# Altium PCB VCB2020.PcbDoc (part 3 of 3)
Units mm, origin at the board's own origin, x right, y up, seen from the top; angles counter-clockwise.
Board outline 146 x 96 mm, 2 copper layers (Top Layer, Bottom Layer); 155 components, 105 nets, 540 pads, 1006 vias.
Unrouted connection lines stored in the file: 5.
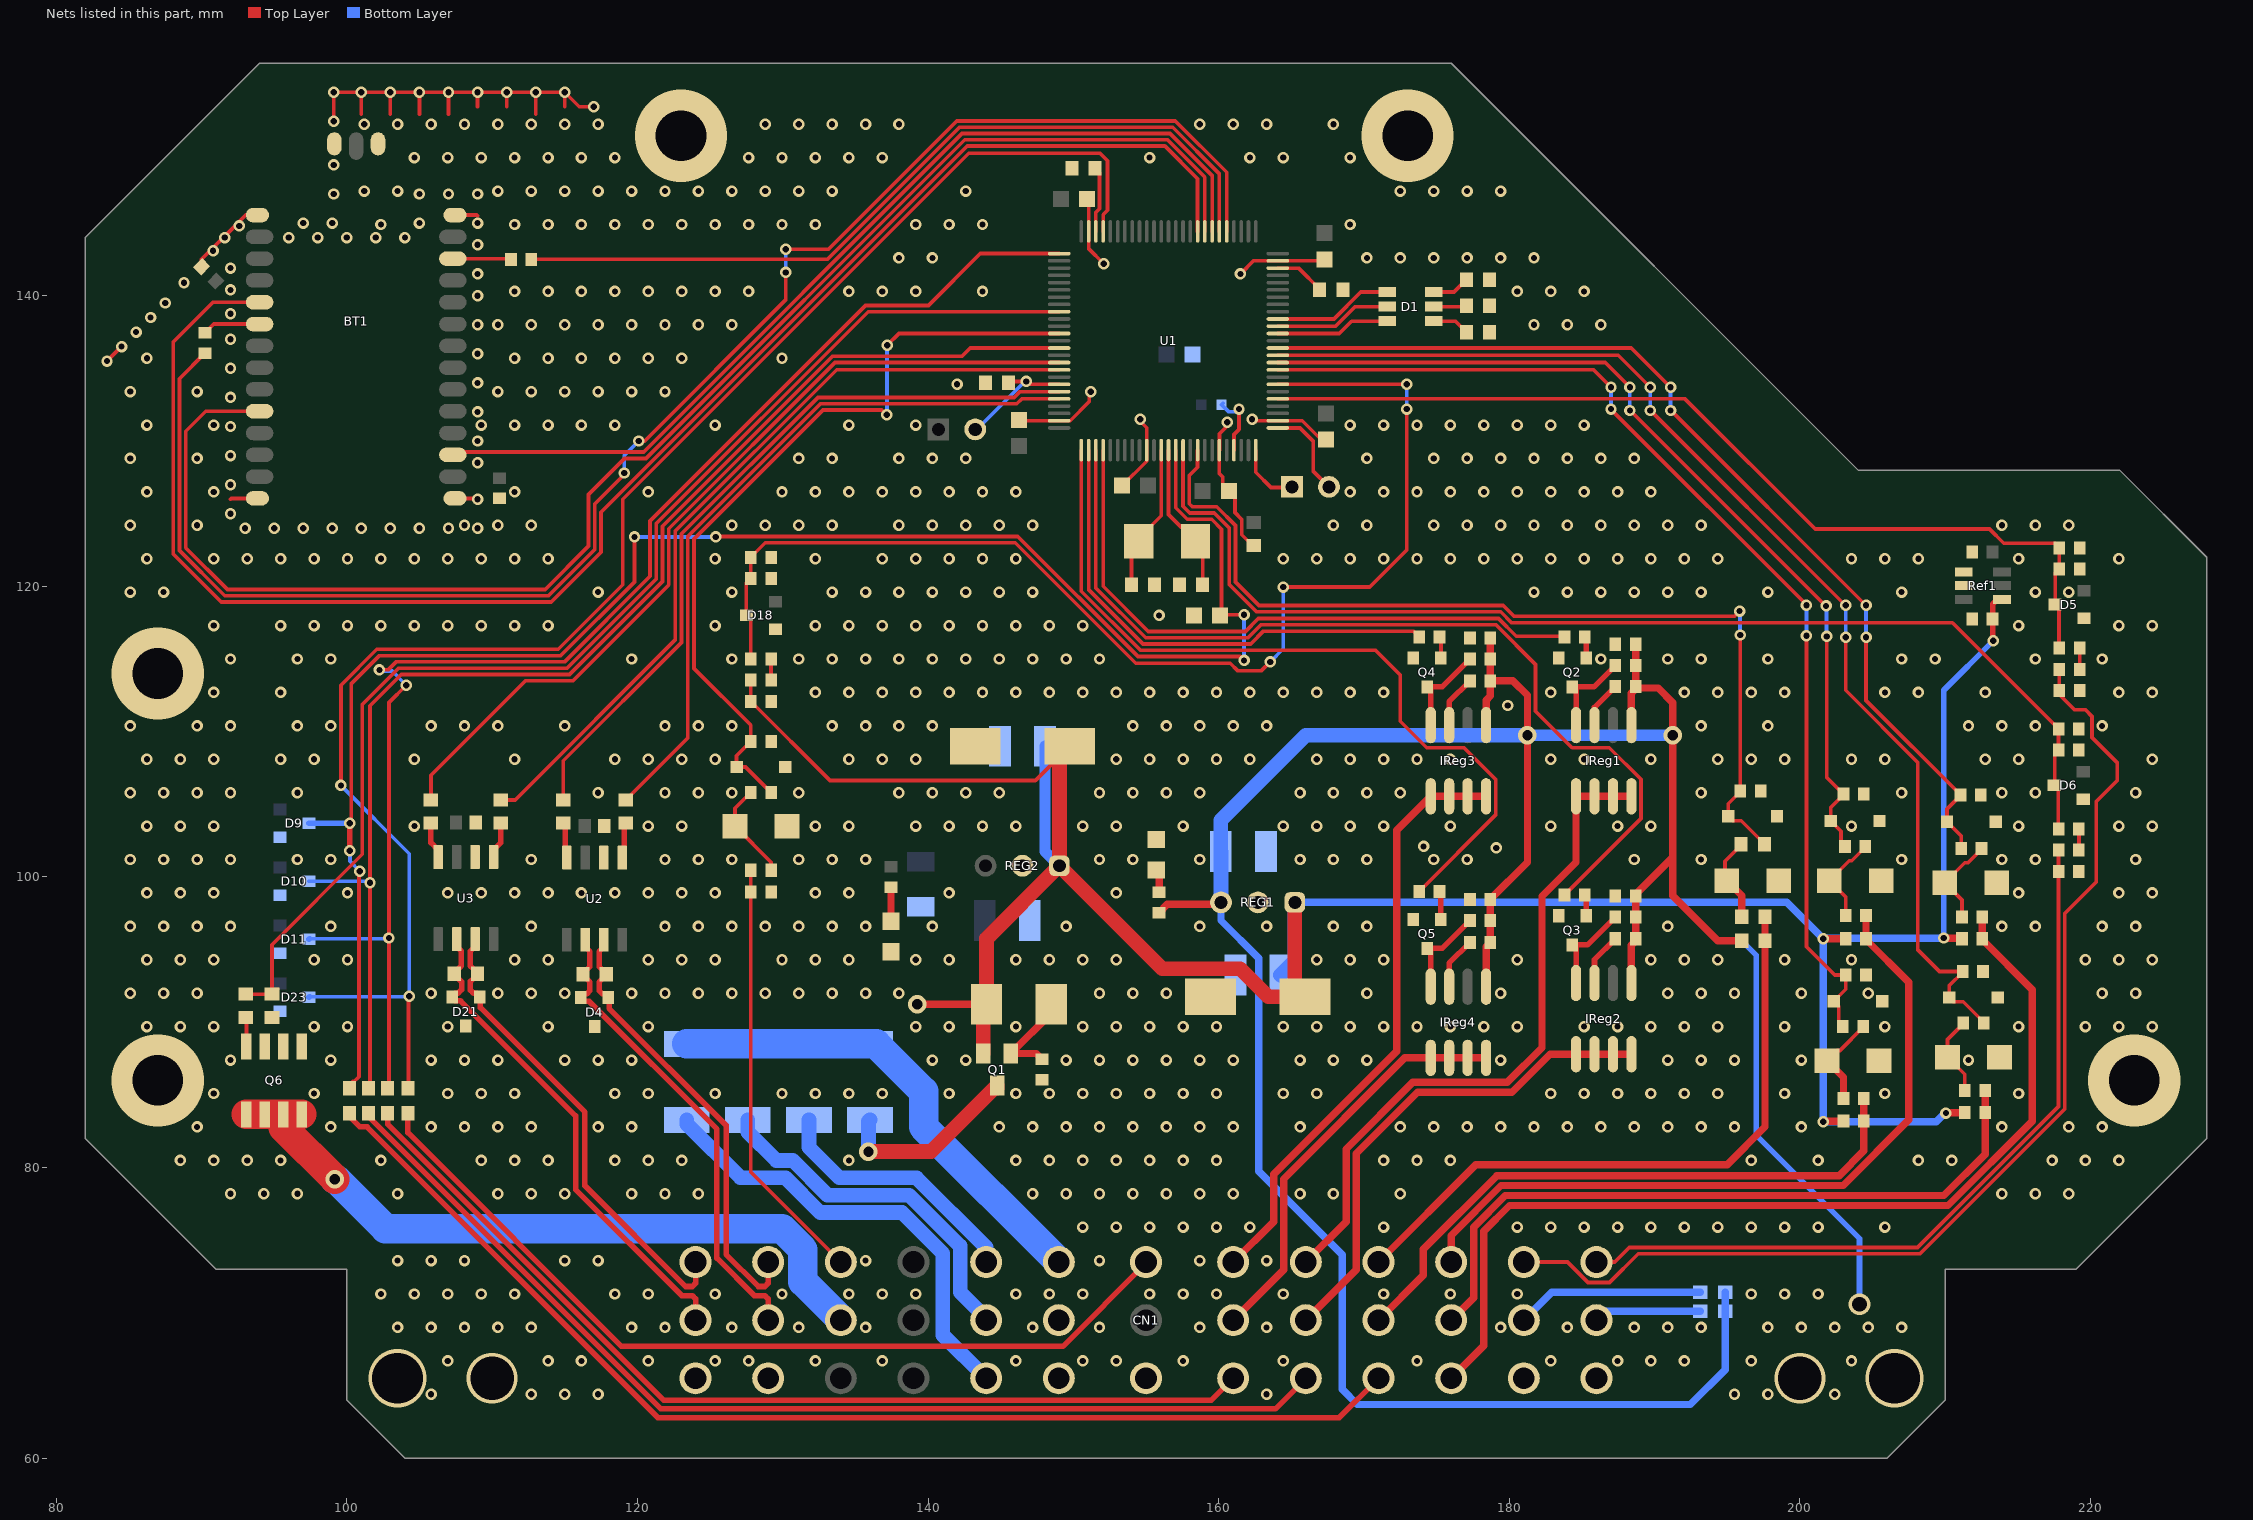
[diagram p2: the nets of this part, all layers, seen from the top]

## Via types
v1: diameter 0.787, hole 0.423, Top Layer to Bottom Layer, 859 vias
v2: diameter 0.787, hole 0.432, Top Layer to Bottom Layer, 126 vias
v3: diameter 1.27, hole 0.711, Top Layer to Bottom Layer, 10 vias
v4: diameter 6.35, hole 3.48, Top Layer to Bottom Layer, 5 vias
v5: diameter 1.5, hole 1, Top Layer to Bottom Layer, 2 vias
v6: diameter 3.5, hole 3, Top Layer to Bottom Layer, 2 vias
v7: diameter 4, hole 3.5, Top Layer to Bottom Layer, 2 vias

## Nets (pads, with @x,y where several pads share a name; then routed paths per layer and width w, separated by ;. In a path a pad name is that pad's centre, name@x,y a point inside that pad or via, vN(x,y) a via of type N, cw(c..) or ccw(c..) an arc to the next point about the centre after c; other vN are vias at no path point) (continued)
5v: C14.2 C34.2 C35.2 C36.2 C37.2 F1.1 F2.1 IReg1.1 IReg2.1 IReg3.1 IReg4.1 R6.1 R20.2 R47.1 R48.1 R50.1 R51.1 R53.1 R54.1 R56.1 R57.1 REG1.3 | length 209.6
  Top Layer w0.508: R6.1@155.904,97.55 156.472,98.118 160.16,98.118 REG1.3@160.16,98.25 ; IReg4.1@178.405,92.45 178.405,95.205 R56.1@178.7,95.5 R57.1@178.7,97 C37.2@178.7,98.454 181.25,101.004 v3(181.25,109.75) 181.25,112.5 180.25,113.5 R53.1@178.7,113.5 ; IReg3.1@178.405,110.45 178.405,112.155 178.7,112.45 R53.1@178.7,113.5 ; C36.2@178.7,116.454 R54.1@178.7,115 R53.1@178.7,113.5 ; IReg2.1@188.405,92.95 188.405,95.309 188.7,95.604 188.7,97.059 R51.1@188.7,97.25 188.7,98.8 191.25,101.35 ; IReg1.1@188.405,110.45 188.405,112.655 188.75,113 190.25,113 191.25,112 v3(191.25,109.75) 191.25,101.35 ; R47.1@188.7,113.5 C34.2@188.7,116.013 ; R20.2@196,95.6 194.35,95.6 191.25,98.7 191.25,101.35
  Bottom Layer w0.381: 196,95.6 197,94.6 197,82.208 204.1,75.108 v5(204.1,70.6)
  Bottom Layer w0.508: REG1.3@160.16,98.25 160.16,97.001 162.75,94.411 162.75,79.75 168.5,74 168.5,64.75 169.55,63.7 192.45,63.7 194.85,66.1 F1.1@194.85,70.113 F2.1@194.85,71.42
  Bottom Layer w0.762: v3(181.25,109.75) v3(191.25,109.75)
  Bottom Layer w1.016: REG1.3@160.16,98.25 160.16,101.74 C14.2@160.15,101.75 160.15,103.9 166,109.75 v3(181.25,109.75)
"\B\r\a\k\e\ \P\r\e\s\s": CN1.10 R20.1 R21.1 | length 44.9
  Top Layer w0.508: CN1.10@171,73.5 177.7,80.2 195,80.2 197.6,82.8 R20.1@197.6,95.6 R21.1@197.6,97.25
"APPS 1 5V": CN1.1 R16.1 R18.2 | length 53.9
  Top Layer w0.254: CN1.1@186,73.5 187.25,73.5 188.25,74.5 208.09,74.5 217.8,84.21 R18.2@217.8,100.387 R16.1@217.8,101.841
"APPS 1 Pwr": CN1.2 F1.2 | length 7.4
  Bottom Layer w0.508: CN1.2@186,69.5 186.613,70.113 F1.2@193.15,70.113
"APPS 2 5V": CN1.4 R12.1 R14.2 | length 76.9
  Top Layer w0.254: CN1.4@181,73.25 CN1.4@181,73.5 184.013,73.5 185.418,72.095 186.895,72.095 188.868,74.068 208.269,74.068 218.232,84.031 218.232,97.482 220.4,99.65 220.4,105.2 221.848,106.648 221.848,107.85 220.1,109.599 220.1,111.05 219.65,111.5 218.9,111.5 217.85,112.55 R14.2@217.85,112.837 R12.1@217.85,114.291
"APPS 2 Pwr": CN1.5 F2.2 | length 12.9
  Bottom Layer w0.508: CN1.5@181,69.5 182.92,71.42 F2.2@193.15,71.42
"BCO Ctrl": CN1.32 Q6.5 Q6.6 Q6.7 Q6.8 | length 49.9
  Top Layer w2.032: Q6.5@93.095,83.66 Q6.6@94.365,83.66 Q6.7@95.635,83.66 ; Q6.7@95.635,83.67 Q6.7@95.635,83.66 ; Q6.8@96.905,83.66 Q6.7@95.635,83.66 ; v3(99.175,79.2) 95.635,82.74 Q6.7@95.635,83.66
  Bottom Layer w2.032: v3(99.175,79.2) 99.25,79.2 102.656,75.794 129.95,75.794 131.387,74.357 131.387,72.158 134,69.545 CN1.32@134,69.5
BOOT0: P1.2 R4.1 U1.94 | length 8.9
  Top Layer w0.254: P1.2@143.25,130.8 P1.2@143.601,131.151 ; R4.1@145.55,134 145.65,134.1 v2(146.75,134.1) ; v2@146.75,133.9 U1.94@149.025,133.9
  Bottom Layer w0.254: P1.2@143.25,130.8 143.35,130.8 146.65,134.1 v2(146.75,134.1)
"BPS Interm": D7.2 R21.2 R60.1 | length 5.9
  Top Layer w0.254: D7.2@194.96,99.75 194.85,99.86 194.85,101.087 195.95,102.187 R60.1@195.95,102.237
  Top Layer w0.508: D7.2@194.96,99.75 194.97,99.75 196,98.72 R21.2@196,97.25
"BT NCTS": BT1.10 U1.58 | length 104.7
  Top Layer w0.254: BT1.10@94,132.05 90.3,132.05 88.922,130.672 88.922,122.647 91.785,119.785 113.65,119.785 116.636,122.771 116.636,126.324 119.112,128.8 120.589,128.8 142.521,150.732 156.479,150.732 159.05,148.161 U1.58@159.05,144.425
"BT NRTS": BT1.5 U1.59 | length 112.7
  Top Layer w0.254: BT1.5@94,139.55 90.8,139.55 88.059,136.809 88.059,122.231 91.369,118.921 114.067,118.921 117.5,122.354 117.5,125.1 142.7,150.3 156.3,150.3 158.55,148.05 U1.59@158.55,144.425
"BT Reset": BT1.17 U1.57 | length 66.5
  Top Layer w0.254: BT1.17@107.35,129 BT1.17@107.3,129.05 107.5,129.25 120.429,129.25 142.342,151.164 156.658,151.164 159.55,148.271 U1.57@159.55,144.425
"BT Rx": BT1.6 R33.2 | length 4
  Top Layer w0.254: R33.2@90.25,137.45 90.85,138.05 BT1.6@94,138.05
"BT Tx": BT1.26 R32.1 | length 4
  Top Layer w0.254: BT1.26@107.3,142.55 111.25,142.55 R32.1@111.3,142.5
"CAN Rx": R9.2 U1.95 | length 51.7
  Top Layer w0.254: R9.2@114.9,105.3 114.9,108 123.036,116.136 123.036,123.615 132.421,133 145.931,133 146.331,133.4 U1.95@149.025,133.4
"CAN Tx": R10.2 U1.96 | length 49.4
  Top Layer w0.254: R10.2@119.209,105.3 119.259,105.3 119.582,105.623 119.582,105.673 123.468,109.56 123.468,123.437 132.6,132.568 146.11,132.568 146.442,132.9 U1.96@149.025,132.9
CAN_N: CN1.35 D4.2 R11.1 U2.6 | length 33.2
  Top Layer w0.381: U2.6@116.337,95.597 U2.6@116.419,95.679 116.419,95.179 116.737,94.862 116.737,93.832 116.254,93.35 R11.1@116.254,93.3 116.254,93.25 116.737,92.767 116.737,92.178 116.514,91.955 116.314,91.955 116.104,91.746 D4.2@116.104,91.696 116.104,91.646 116.314,91.436 116.685,91.436 125.468,82.653 125.468,73.77 128.056,71.183 128.777,71.183 129,70.959 CN1.35@129,69.5
CAN_P: CN1.34 D4.1 R11.2 U2.7 | length 31.4
  Top Layer w0.381: U2.7@117.772,95.597 U2.7@117.689,95.679 117.689,95.179 117.372,94.862 117.372,93.832 117.854,93.35 R11.2@117.854,93.3 117.854,93.25 117.372,92.768 117.372,92.178 117.595,91.955 117.795,91.955 118.004,91.746 D4.1@118.004,91.696 118.056,91.644 118.056,90.963 126.103,82.916 126.103,74.033 128.319,71.818 128.777,71.818 129,72.041 CN1.34@129,73.5
"Dash Power": CN1.27 F11.2 | length 31.4
  Bottom Layer w1.016: F11.2@123.4,83.285 123.4,83 127.1,79.3 130.194,79.3 132.588,76.906 138.217,76.906 141.02,74.103 141.02,68.48 CN1.27@144,65.5
"Dash Toggle": CN1.9 R31.1 R34.1 | length 67.4
  Top Layer w0.508: CN1.9@176,65.5 178.236,67.736 178.236,75.616 180.012,77.393 210.193,77.393 216,83.2 216,92.25 212.55,95.7 R31.1@212.55,95.75 R34.1@212.55,97.25
"Dash Toggle Interm": D19.2 R34.2 R35.1 | length 6.4
  Top Layer w0.254: D19.2@209.96,99.6 D19.2@209.97,99.6 ; R34.2@211.15,97.25 211.15,98.42 D19.2@209.97,99.6 ; R35.1@212.5,101.95 212.5,101.9 211.57,100.97 211.34,100.97 D19.2@209.97,99.6
"Debug LED B": D1.6 U1.39 | length 7.9
  Top Layer w0.254: U1.39@164.075,137.4 168.3,137.4 169.15,138.25 D1.6@171.6,138.25
"Debug LED G": D1.5 U1.40 | length 8.1
  Top Layer w0.254: U1.40@164.075,137.9 168.042,137.9 169.392,139.25 D1.5@171.6,139.25
"Debug LED R": D1.4 U1.41 | length 8.3
  Top Layer w0.254: U1.41@164.075,138.4 167.931,138.4 169.781,140.25 D1.4@171.6,140.25
"GLV Power In": CN1.22 F8.1 F9.1 F10.1 F11.1 | length 33.3
  Bottom Layer w2.032: F11.1@123.4,88.515 F10.1@127.6,88.515 F9.1@131.8,88.515 F8.1@136,88.515 136.433,88.515 139.7,85.248 139.7,82.8 CN1.22@149,73.5
GND: BT1.1 BT1.14 BT1.15 BT1.28 BT1.29 BT1.31 C1.1 C2.1 C3.1 C4.1 C5.1 C6.1 C7.1 C8.1 C9.1 C10.1 C11.1 C12.2 C13.1 C14.1 C15.1 C16.2 C17.1 C18.1 C19.1 C20.1 C21.1 C22.1 C23.1 C24.1 C25.1 C26.1 C27.1 C28.1 C29.1 C30.1 C31.1 C32.1 C33.1 C34.1 C35.1 C36.1 C37.1 C38.1 CN1.3 CN1.6 CN1.21 CN1.23 CN1.24 CN1.36 CN1.39 D3.1 D4.3 D5.1 D6.1 D7.1 D8.1 D9.1 D10.1 D11.1 D12.1 D13.1 D14.1 D15.1 D16.1 D17.1 D18.1 D19.1 D20.1 D21.3 D22.1 D23.1 DS1.2 DS2.2 Q2.2 Q3.2 Q4.2 Q5.2 Q6.1 Q6.2 Q6.3 R1.2 R2.2 R3.2 R4.2 R5.1 R8.1 R14.1 R15.1 R18.1 R19.1 R42.1 R45.1 R46.1 R59.1 Ref1.1 Ref1.2 REG1.2 REG2.2 U1.10 U1.20 U1.27 U1.49 U1.74 U1.99 U2.2 U3.2 | length 81.3
  Top Layer w0.254: v2(83.5,135.5) v2(84.5,136.5) ; C28.1@90.005,141.995 90.005,142.505 92.3,144.8 v2(92.6,144.8) 92.6,145.1 93.05,145.55 BT1.1@93.85,145.55 ; 92,126 92.05,126.05 BT1.14@93.85,126.05 ; v2(99.1,152) v2(99.1,154) v2(101,154) ; 101,152.5 v2(101,154) ; 103,152.5 v2(103,154) ; 105,152.5 v2(105,154) ; 107,152.5 v2(107,154) ; BT1.15@107.45,126.05 108.95,126.05 v2(109,126) ; BT1.28@107.45,145.55 108.95,145.55 109,145.5 ; 109,153 v2(109,154) ; 111,153 v2(111,154) ; 113,152.5 v2(113,154) ; 115,153 v2(115,154) ; v2(117,153) 116,153 v2(115,154) ; C9.1@146.25,131.45 146.3,131.4 U1.99@149.025,131.4 149.027,131.402 149.785,131.402 151.098,132.715 151.098,133.298 v2(151.2,133.4) ; C25.1@150.95,146.654 151.05,146.554 U1.74@151.05,144.425 151.05,143.25 v2(152.1,142.2) ; C6.1@153.35,126.95 153.383,126.95 155.048,128.615 155.048,129.373 U1.10@155.05,129.375 155.05,130.906 154.6,131.356 v2(154.6,131.5) ; v2(160.6,131.3) 160.6,131.056 160.052,130.508 160.052,129.377 U1.20@160.05,129.375 160.05,127.75 160.277,127.523 160.277,126.973 C7.1@160.7,126.55 161.123,126.127 161.123,125.077 161.595,124.605 161.595,123.555 162.35,122.8 C3.1@162.4,122.8 ; v2(161.5,141.5) 162.4,142.4 U1.49@164.075,142.4 167.196,142.4 C23.1@167.3,142.504 ; v2(162.3,131.5) 162.398,131.402 164.073,131.402 U1.27@164.075,131.4 165.75,131.4 C8.1@167.4,129.75 ; v2(101,154) v2(103,154) ; v2(103,154) v2(105,154) ; v2(105,154) v2(107,154) ; v2(107,154) v2(109,154) ; v2(109,154) v2(111,154) ; v2(111,154) v2(113,154) ; v2(113,154) v2(115,154)
  other v1: 105.8,64.4 112.7,64.4 115,64.4 117.3,64.4 163.3,64.4 195.5,64.4 197.8,64.4 202.4,64.4 106.95,66.7 113.85,66.7 116.15,66.7 120.75,66.7 125.35,66.7 127.65,66.7 132.25,66.7 136.85,66.7 146.05,66.7 150.65,66.7 152.95,66.7 157.55,66.7 164.45,66.7 173.65,66.7 182.85,66.7 187.45,66.7 189.75,66.7 192.05,66.7 196.65,66.7 203.55,66.7 103.5,69 105.8,69 108.1,69 110.4,69 112.7,69 119.6,69 121.9,69 126.5,69 131.1,69 135.7,69 147.2,69 151.8,69 158.7,69 163.3,69 179.4,69 184,69 188.6,69 190.9,69 193.2,69 197.8,69 200.1,69 202.4,69 204.7,69 207,69 102.35,71.3 104.65,71.3 106.95,71.3 109.25,71.3 111.55,71.3 118.45,71.3 120.75,71.3 125.35,71.3 129.95,71.3 134.55,71.3 136.85,71.3 139.15,71.3 146.05,71.3 148.35,71.3 150.65,71.3 155.25,71.3 157.55,71.3 159.85,71.3 164.45,71.3 171.35,71.3 175.95,71.3 180.55,71.3 196.65,71.3 198.95,71.3 201.25,71.3 103.5,73.6 105.8,73.6 108.1,73.6 115,73.6 117.3,73.6 135.7,73.6 151.8,73.6 158.7,73.6 163.3,73.6 150.65,75.9 152.95,75.9 155.25,75.9 157.55,75.9 159.85,75.9 162.15,75.9 171.35,75.9 180.55,75.9 182.85,75.9 185.15,75.9 187.45,75.9 189.75,75.9 192.05,75.9 194.35,75.9 196.65,75.9 198.95,75.9 201.25,75.9 205.85,75.9 92,78.2 94.3,78.2 96.6,78.2 103.5,78.2 110.4,78.2 112.7,78.2 115,78.2 119.6,78.2 121.9,78.2 124.2,78.2 147.2,78.2 149.5,78.2 151.8,78.2 154.1,78.2 156.4,78.2 158.7,78.2 161,78.2 165.6,78.2 167.9,78.2 172.5,78.2 213.9,78.2 216.2,78.2 218.5,78.2 88.55,80.5 90.85,80.5 93.15,80.5 95.45,80.5 102.35,80.5 109.25,80.5 111.55,80.5 113.85,80.5 118.45,80.5 120.75,80.5 123.05,80.5 134.55,80.5 146.05,80.5 148.35,80.5 150.65,80.5 152.95,80.5 155.25,80.5 157.55,80.5 159.85,80.5 171.35,80.5 173.65,80.5 175.95,80.5 196.65,80.5 201.25,80.5 208.15,80.5 210.45,80.5 217.35,80.5 219.65,80.5 221.95,80.5 89.7,82.8 98.9,82.8 105.8,82.8 108.1,82.8 110.4,82.8 112.7,82.8 117.3,82.8 119.6,82.8 144.9,82.8 147.2,82.8 149.5,82.8 151.8,82.8 154.1,82.8 156.4,82.8 158.7,82.8 161,82.8 165.6,82.8 172.5,82.8 174.8,82.8 177.1,82.8 179.4,82.8 181.7,82.8 184,82.8 186.3,82.8 188.6,82.8 190.9,82.8 193.2,82.8 195.5,82.8 200.1,82.8 213.9,82.8 218.5,82.8 220.8,82.8 90.85,85.1 97.75,85.1 106.95,85.1 109.25,85.1 111.55,85.1 118.45,85.1 120.75,85.1 125.35,85.1 129.95,85.1 132.25,85.1 134.55,85.1 136.85,85.1 141.45,85.1 146.05,85.1 148.35,85.1 150.65,85.1 152.95,85.1 155.25,85.1 157.55,85.1 159.85,85.1 164.45,85.1 166.75,85.1 182.85,85.1 185.15,85.1 187.45,85.1 189.75,85.1 192.05,85.1 194.35,85.1 198.95,85.1 205.85,85.1 215.05,85.1 92,87.4 98.9,87.4 105.8,87.4 108.1,87.4 110.4,87.4 115,87.4 117.3,87.4 119.6,87.4 140.3,87.4 142.6,87.4 149.5,87.4 151.8,87.4 154.1,87.4 156.4,87.4 158.7,87.4 161,87.4 165.6,87.4 167.9,87.4 170.2,87.4 179.4,87.4 190.9,87.4 193.2,87.4 195.5,87.4 200.1,87.4 211.6,87.4 86.25,89.7 88.55,89.7 90.85,89.7 97.75,89.7 100.05,89.7 106.95,89.7 113.85,89.7 120.75,89.7 139.15,89.7 141.45,89.7 146.05,89.7 150.65,89.7 152.95,89.7 155.25,89.7 157.55,89.7 159.85,89.7 164.45,89.7 166.75,89.7 169.05,89.7 171.35,89.7 173.65,89.7 175.95,89.7 178.25,89.7 180.55,89.7 185.15,89.7 187.45,89.7 189.75,89.7 192.05,89.7 194.35,89.7 198.95,89.7 205.85,89.7 215.05,89.7 219.65,89.7 221.95,89.7 224.25,89.7 85.1,92 87.4,92 89.7,92 105.8,92 110.4,92 112.7,92 115,92 119.6,92 121.9,92 124.2,92 126.5,92 128.8,92 131.1,92 133.4,92 135.7,92 138,92 151.8,92 154.1,92 156.4,92 170.2,92 179.4,92 190.9,92 193.2,92 195.5,92 200.1,92 204.7,92 220.8,92 223.1,92 86.25,94.3 88.55,94.3 90.85,94.3 97.75,94.3 100.05,94.3 111.55,94.3 113.85,94.3 120.75,94.3 123.05,94.3 125.35,94.3 129.95,94.3 132.25,94.3 134.55,94.3 139.15,94.3 141.45,94.3 146.05,94.3 148.35,94.3 150.65,94.3 152.95,94.3 166.75,94.3 169.05,94.3 171.35,94.3 180.55,94.3 189.75,94.3 192.05,94.3 194.35,94.3 198.95,94.3 203.55,94.3 219.65,94.3 221.95,94.3 224.25,94.3 85.1,96.6 87.4,96.6 89.7,96.6 92,96.6 98.9,96.6 112.7,96.6 121.9,96.6 124.2,96.6 126.5,96.6 128.8,96.6 131.1,96.6 133.4,96.6 135.7,96.6 140.3,96.6 149.5,96.6 158.7,96.6 163.3,96.6 167.9,96.6 170.2,96.6 190.9,96.6 213.9,96.6 216.2,96.6 220.8,96.6 223.1,96.6 86.25,98.9 88.55,98.9 90.85,98.9 100.05,98.9 106.95,98.9 109.25,98.9 111.55,98.9 113.85,98.9 116.15,98.9 118.45,98.9 120.75,98.9 123.05,98.9 125.35,98.9 132.25,98.9 134.55,98.9 141.45,98.9 152.95,98.9 215.05,98.9 221.95,98.9 224.25,98.9 85.1,101.2 87.4,101.2 89.7,101.2 92,101.2 96.6,101.2 98.9,101.2 112.7,101.2 121.9,101.2 124.2,101.2 126.5,101.2 131.1,101.2 133.4,101.2 135.7,101.2 151.8,101.2 154.1,101.2 158.7,101.2 165.6,101.2 167.9,101.2 170.2,101.2 174.8,101.2 177.1,101.2 188.6,101.2 193.2,101.2 207,101.2 213.9,101.2 216.2,101.2 223.1,101.2 86.25,103.5 88.55,103.5 90.85,103.5 104.65,103.5 120.75,103.5 123.05,103.5 132.25,103.5 134.55,103.5 139.15,103.5 141.45,103.5 143.75,103.5 146.05,103.5 150.65,103.5 152.95,103.5 157.55,103.5 164.45,103.5 166.75,103.5 169.05,103.5 171.35,103.5 175.95,103.5 182.85,103.5 187.45,103.5 189.75,103.5 203.55,103.5 215.05,103.5 221.95,103.5 224.25,103.5 85.1,105.8 87.4,105.8 89.7,105.8 92,105.8 96.6,105.8 117.3,105.8 121.9,105.8 124.2,105.8 126.5,105.8 131.1,105.8 138,105.8 140.3,105.8 142.6,105.8 144.9,105.8 151.8,105.8 154.1,105.8 156.4,105.8 158.7,105.8 165.6,105.8 167.9,105.8 170.2,105.8 172.5,105.8 193.2,105.8 207,105.8 213.9,105.8 216.2,105.8 223.1,105.8 86.25,108.1 88.55,108.1 90.85,108.1 95.45,108.1 97.75,108.1 104.65,108.1 111.55,108.1 118.45,108.1 120.75,108.1 123.05,108.1 125.35,108.1 134.55,108.1 136.85,108.1 139.15,108.1 152.95,108.1 155.25,108.1 157.55,108.1 159.85,108.1 162.15,108.1 166.75,108.1 169.05,108.1 171.35,108.1 173.65,108.1 175.95,108.1 182.85,108.1 185.15,108.1 189.75,108.1 194.35,108.1 196.65,108.1 198.95,108.1 203.55,108.1 205.85,108.1 212.75,108.1 215.05,108.1 224.25,108.1 85.1,110.4 89.7,110.4 92,110.4 96.6,110.4 98.9,110.4 105.8,110.4 108.1,110.4 110.4,110.4 115,110.4 121.9,110.4 124.2,110.4 126.5,110.4 133.4,110.4 135.7,110.4 138,110.4 140.3,110.4 154.1,110.4 156.4,110.4 158.7,110.4 161,110.4 163.3,110.4 193.2,110.4 197.8,110.4 211.6,110.4 213.9,110.4 216.2,110.4 220.8,110.4 90.85,112.7 95.45,112.7 132.25,112.7 134.55,112.7 136.85,112.7 139.15,112.7 141.45,112.7 143.75,112.7 146.05,112.7 148.35,112.7 150.65,112.7 152.95,112.7 155.25,112.7 157.55,112.7 159.85,112.7 162.15,112.7 164.45,112.7 166.75,112.7 169.05,112.7 171.35,112.7 182.85,112.7 192.05,112.7 194.35,112.7 196.65,112.7 198.95,112.7 205.85,112.7 208.15,112.7 212.75,112.7 221.95,112.7 224.25,112.7 92,115 96.6,115 98.9,115 119.6,115 126.5,115 131.1,115 133.4,115 135.7,115 138,115 140.3,115 142.6,115 144.9,115 147.2,115 149.5,115 151.8,115 186.3,115 190.9,115 193.2,115 197.8,115 207,115 209.3,115 216.2,115 220.8,115 90.85,117.3 95.45,117.3 97.75,117.3 100.05,117.3 102.35,117.3 104.65,117.3 106.95,117.3 109.25,117.3 111.55,117.3 113.85,117.3 125.35,117.3 132.25,117.3 134.55,117.3 136.85,117.3 139.15,117.3 141.45,117.3 143.75,117.3 146.05,117.3 148.35,117.3 150.65,117.3 215.05,117.3 221.95,117.3 224.25,117.3 85.1,119.6 87.4,119.6 117.3,119.6 126.5,119.6 133.4,119.6 135.7,119.6 138,119.6 140.3,119.6 142.6,119.6 144.9,119.6 147.2,119.6 181.7,119.6 184,119.6 186.3,119.6 188.6,119.6 190.9,119.6 193.2,119.6 197.8,119.6 207,119.6 216.2,119.6 218.5,119.6 86.25,121.9 90.85,121.9 93.15,121.9 95.45,121.9 97.75,121.9 100.05,121.9 102.35,121.9 104.65,121.9 106.95,121.9 109.25,121.9 111.55,121.9 113.85,121.9 125.35,121.9 132.25,121.9 136.85,121.9 139.15,121.9 141.45,121.9 143.75,121.9 146.05,121.9 164.45,121.9 166.75,121.9 169.05,121.9 171.35,121.9 173.65,121.9 175.95,121.9 178.25,121.9 180.55,121.9 182.85,121.9 185.15,121.9 187.45,121.9 189.75,121.9 192.05,121.9 194.35,121.9 203.55,121.9 205.85,121.9 208.15,121.9 215.05,121.9 221.95,121.9 85.1,124.2 89.7,124.2 108.1,124.2 110.4,124.2 112.7,124.2 126.5,124.2 128.8,124.2 131.1,124.2 133.4,124.2 138,124.2 140.3,124.2 142.6,124.2 144.9,124.2 147.2,124.2 167.9,124.2 170.2,124.2 174.8,124.2 177.1,124.2 179.4,124.2 181.7,124.2 184,124.2 186.3,124.2 188.6,124.2 190.9,124.2 193.2,124.2 213.9,124.2 216.2,124.2 218.5,124.2 86.25,126.5 90.85,126.5 111.55,126.5 120.75,126.5 129.95,126.5 132.25,126.5 134.55,126.5 136.85,126.5 139.15,126.5 141.45,126.5 143.75,126.5 146.05,126.5 169.05,126.5 171.35,126.5 173.65,126.5 175.95,126.5 178.25,126.5 180.55,126.5 182.85,126.5 185.15,126.5 187.45,126.5 189.75,126.5 85.1,128.8 89.7,128.8 131.1,128.8 133.4,128.8 138,128.8 140.3,128.8 142.6,128.8 170.2,128.8 174.8,128.8 177.1,128.8 179.4,128.8 181.7,128.8 184,128.8 186.3,128.8 188.6,128.8 86.25,131.1 90.85,131.1 109.25,131.1 111.55,131.1 113.85,131.1 116.15,131.1 118.45,131.1 125.35,131.1 134.55,131.1 139.15,131.1 169.05,131.1 171.35,131.1 173.65,131.1 175.95,131.1 178.25,131.1 180.55,131.1 182.85,131.1 185.15,131.1 85.1,133.4 89.7,133.4 110.4,133.4 112.7,133.4 115,133.4 117.3,133.4 119.6,133.4 121.9,133.4 86.25,135.7 111.55,135.7 113.85,135.7 116.15,135.7 118.45,135.7 120.75,135.7 123.05,135.7 129.95,135.7 110.4,138 112.7,138 115,138 117.3,138 119.6,138 121.9,138 124.2,138 126.5,138 181.7,138 184,138 186.3,138 111.55,140.3 113.85,140.3 116.15,140.3 118.45,140.3 120.75,140.3 123.05,140.3 125.35,140.3 127.65,140.3 134.55,140.3 136.85,140.3 139.15,140.3 143.75,140.3 180.55,140.3 182.85,140.3 185.15,140.3 138,142.6 140.3,142.6 170.2,142.6 172.5,142.6 174.8,142.6 177.1,142.6 179.4,142.6 181.7,142.6 102.35,144.9 111.55,144.9 113.85,144.9 116.15,144.9 118.45,144.9 120.75,144.9 123.05,144.9 125.35,144.9 127.65,144.9 129.95,144.9 132.25,144.9 139.15,144.9 141.45,144.9 143.75,144.9 169.05,144.9 101.2,147.2 103.5,147.2 110.4,147.2 112.7,147.2 115,147.2 117.3,147.2 119.6,147.2 121.9,147.2 124.2,147.2 126.5,147.2 128.8,147.2 131.1,147.2 133.4,147.2 142.6,147.2 172.5,147.2 174.8,147.2 177.1,147.2 179.4,147.2 104.65,149.5 106.95,149.5 109.25,149.5 111.55,149.5 113.85,149.5 116.15,149.5 118.45,149.5 127.65,149.5 129.95,149.5 132.25,149.5 134.55,149.5 136.85,149.5 155.25,149.5 162.15,149.5 164.45,149.5 169.05,149.5 101.2,151.8 103.5,151.8 105.8,151.8 108.1,151.8 110.4,151.8 112.7,151.8 115,151.8 117.3,151.8 128.8,151.8 131.1,151.8 133.4,151.8 135.7,151.8 138,151.8 158.7,151.8 161,151.8 163.3,151.8 167.9,151.8
  other v2: 179.1,102 174.1,102.1 179.9,111.8 155.9,118 93,124 95,124 97,124 99,124 101,124 103,124 105,124 107,124 109,124 92,125 92,127 109,128.5 92,129 109,130 92,131 109,132 92,133 142,133.9 109,134 92,135 109,136 92,137 85.5,137.5 109,138 86.5,138.5 92,138.75 87.5,139.5 109,140 92,140.4 88.8,140.9 109,141.5 92,141.9 90.8,143.1 109,143.5 91.6,144 96,144 98,144 100,144 102,144 104,144 97,145 99,145 105,145 109,145 99.1,147 105,147 107,147 109,147 99.1,149
  other v4: 87,86 223,86 87,114 123,151 173,151
  other v6: 110,65.5 200,65.5
  other v7: 103.5,65.5 206.5,65.5
NetD1_1: D1.1 R3.1 | length 2.6
  Top Layer w0.254: D1.1@174.8,138.25 176.3,138.25 R3.1@177.05,137.5
NetD1_2: D1.2 R2.1 | length 2.3
  Top Layer w0.254: D1.2@174.8,139.25 176.996,139.25 R2.1@177.05,139.304
NetD1_3: D1.3 R1.1 | length 2.6
  Top Layer w0.254: D1.3@174.8,140.25 176.192,140.25 R1.1@177.05,141.109
NetD2_A: D2.A Q1.1 R5.2 | length 6.9
  Top Layer w0.508: R5.2@147.854,87.45 147.454,87.85 Q1.1@145.7,87.85 148.475,90.625 D2.A@148.475,91.25
NetDS1_1: DS1.1 R6.2 | length 1.6
  Top Layer w0.508: DS1.1@155.7,100.479 155.904,100.275 R6.2@155.904,98.95
NetDS2_1: DS2.1 R7.2 | length 2.3
  Top Layer w0.508: DS2.1@137.45,96.966 R7.2@137.45,99.3
NetIReg1_3: IReg1.3 R47.2 | length 3.2
  Top Layer w0.381: IReg1.3@185.865,110.45 185.865,111.669 R47.2@187.3,113.104
NetIReg1_4: IReg1.4 Q2.3 R48.2 | length 6.3
  Top Layer w0.381: IReg1.4@184.595,110.45 184.595,112.83 Q2.3@184.346,113.079 185.821,113.079 R48.2@187.3,114.559
NetIReg2_3: IReg2.3 R50.2 | length 3.6
  Top Layer w0.381: IReg2.3@185.865,92.7 185.865,94.315 R50.2@187.3,95.75
NetIReg2_4: IReg2.4 Q3.3 R51.2 | length 6.5
  Top Layer w0.381: IReg2.4@184.595,92.7 184.595,95.08 Q3.3@184.346,95.329 185.379,95.329 R51.2@187.3,97.25
NetIReg3_3: IReg3.3 R53.2 | length 3.6
  Top Layer w0.381: IReg3.3@175.865,110.45 175.865,112.065 R53.2@177.3,113.5
NetIReg3_4: IReg3.4 Q4.3 R54.2 | length 6.5
  Top Layer w0.381: IReg3.4@174.595,110.45 174.595,112.83 Q4.3@174.346,113.079 175.379,113.079 R54.2@177.3,115
NetIReg4_3: IReg4.3 R56.2 | length 3.6
  Top Layer w0.381: IReg4.3@175.865,92.45 175.865,94.065 R56.2@177.3,95.5
NetIReg4_4: IReg4.4 Q5.3 R57.2 | length 6.5
  Top Layer w0.381: IReg4.4@174.595,92.45 174.595,94.83 Q5.3@174.346,95.079 175.379,95.079 R57.2@177.3,97
NetL1_2: L1.2 U1.22 | length 4.6
  Top Layer w0.254: U1.22@161.05,129.375 161.05,130.45 161.4,130.8 v2(161.4,132.2)
  Bottom Layer w0.254: L1.2@160.3,132.6 L1.2@160.2,132.5 160.677,132.023 161.223,132.023 v2(161.4,132.2)
NetQ2_1: Q2.1 R49.1 | length 1.5
  Top Layer w0.381: R49.1@185.2,116.509 185.296,116.413 Q2.1@185.296,115.079
NetQ3_1: Q3.1 R52.1 | length 1.5
  Top Layer w0.381: R52.1@185.2,98.759 185.296,98.663 Q3.1@185.296,97.329
NetQ4_1: Q4.1 R55.1 | length 1.5
  Top Layer w0.254: R55.1@175.2,116.509 175.296,116.413 Q4.1@175.296,115.079
NetQ5_1: Q5.1 R58.1 | length 2
  Top Layer w0.381: R58.1@175.2,99 175.296,98.904 Q5.1@175.296,97.079
NetQ6_4: Q6.4 R39.1 | length 2
  Top Layer w0.254: R39.1@93.05,90.334 93.095,90.289 Q6.4@93.095,88.34
NetR9_1: R9.1 U2.4 | length 2.5
  Top Layer w0.381: R9.1@114.9,103.7 115.025,103.575 115.025,101.454 U2.4@115.149,101.329
NetR10_1: R10.1 U2.1 | length 2.5
  Top Layer w0.381: U2.1@118.959,101.329 119.084,101.454 119.084,103.575 R10.1@119.209,103.7
NetR12_2: R12.2 R13.1 | length 1.5
  Top Layer w0.254: R12.2@219.25,114.291 R13.1@219.25,115.746
NetR16_2: R16.2 R17.1 | length 1.5
  Top Layer w0.254: R16.2@219.2,101.841 R17.1@219.2,103.296
NetR28_1: R28.1 U3.4 | length 2.5
  Top Layer w0.381: R28.1@105.791,103.7 105.791,102.37 106.291,101.871 U3.4@106.291,101.371
NetR29_1: R29.1 U3.1 | length 2.5
  Top Layer w0.381: U3.1@110.101,101.371 110.101,101.871 110.6,102.37 R29.1@110.6,103.7
NetR43_2: R43.2 R44.1 | length 1.5
  Top Layer w0.254: R43.2@129.2,113.541 R44.1@129.2,114.996
NRST: C1.2 D9.3 F5.1 U1.14 | length 120.7
  Top Layer w0.254: v2(100.2,103.7) 100.299,103.799 100.299,113.286 102.244,115.232 114.732,115.232 119.8,120.3 v2(119.8,123.4) ; F5.1@100.453,85.874 100.838,86.259 v2@100.838,100.338 ; v2(125.399,123.399) 125.432,123.432 146.176,123.432 154.441,115.167 161.483,115.167 v2(161.75,114.9) ; U1.14@157.05,129.375 157.05,125.4 157.837,124.613 159.518,124.613 160.2,123.931 160.2,118.096 C1.2@160.154,118.05 ; C1.2@160.1,117.996 C1.2@160.154,118.05 ; v2(161.75,118.05) C1.2@160.154,118.05
  Top Layer w0.381: F5.1@100.193,85.45 100.453,85.71 F5.1@100.453,85.874 ; v2(100.2,101.8) v2(100.2,103.7) ; v2@100.838,100.338 v2(100.9,100.4)
  Bottom Layer w0.254: v2@100.217,101.783 100.217,101.083 v2(100.9,100.4) ; v2@119.801,123.399 v2@125.398,123.399 ; v2(161.75,114.9) v2(161.75,118.05)
  Bottom Layer w0.381: D9.3@97.4,103.689 97.405,103.695 100.195,103.695 v2(100.2,103.7) ; v2(100.2,101.8) v2@100.217,101.783
"NRST F": CN1.12 F5.2 | length 80.7
  Top Layer w0.381: F5.2@100.193,83.75 100.193,83.507 100.9,82.8 101.4,82.8 121.4,62.8 168.3,62.8 CN1.12@171,65.5
"Ph0 OSC In": C4.2 U1.12 X1.2 | length 10.1
  Top Layer w0.254: C4.2@153.996,120.1 153.996,122.596 X1.2@154.5,123.1 154.5,123.3 156.05,124.85 U1.12@156.05,129.375
"Ph1 OSC Out": C10.2 U1.13 X1.1 | length 10.2
  Top Layer w0.254: U1.13@156.55,129.375 156.55,124.95 X1.1@158.4,123.1 158.9,122.6 C10.2@158.9,120.1
"Regen Btn": CN1.11 R36.1 R37.1 | length 42.9
  Top Layer w0.508: CN1.11@171,69.5 174.087,72.587 174.087,74.387 179.15,79.45 202.7,79.45 204.4,81.15 R36.1@204.4,83.2 R37.1@204.4,84.75
"Regen Btn Interm": D22.2 R37.2 R38.1 | length 6.6
  Top Layer w0.254: D22.2@201.86,87.35 202.573,88.063 202.763,88.063 204.35,89.65 R38.1@204.35,89.7
  Top Layer w0.508: D22.2@201.86,87.35 201.87,87.35 203,86.22 R37.2@203,84.75
"RTD BTN": CN1.8 R22.1 R23.1 | length 48.7
  Top Layer w0.508: CN1.8@176,69.5 177.55,71.05 177.55,75.9 179.728,78.078 209.909,78.078 212.75,80.92 R22.1@212.75,83.8 R23.1@212.75,85.3
"RTD LED 1": R52.2 U1.3 | length 65.2
  Top Layer w0.254: U1.3@151.55,129.375 151.55,119.889 154.977,116.462 162.023,116.462 162.911,117.35 179.085,117.35 181.809,114.627 181.809,111.41 184.324,108.895 186.886,108.895 189.06,106.721 189.06,104.018 R52.2@183.8,98.759
"RTD LED 1 Output": CN1.14 IReg2.5 IReg2.6 IReg2.7 IReg2.8 | length 34.7
  Top Layer w0.508: CN1.14@166,69.5 169.468,72.968 169.468,80.968 173.682,85.182 180.182,85.182 182.8,87.8 IReg2.5@184.595,87.8 IReg2.6@185.865,87.8 IReg2.7@187.135,87.8 IReg2.8@188.405,87.8
"RTD LED 2": R58.2 U1.1 | length 55.3
  Top Layer w0.254: U1.1@150.55,129.375 150.55,119.668 154.62,115.598 170.802,115.598 172.5,113.9 172.5,110.719 174.324,108.895 176.886,108.895 179.06,106.721 179.06,104.26 R58.2@173.8,99
"RTD LED 2 Output": CN1.17 IReg4.5 IReg4.6 IReg4.7 IReg4.8 | length 28.5
  Top Layer w0.508: CN1.17@161,69.5 164.468,72.968 164.468,79.218 172.8,87.55 IReg4.5@174.595,87.55 IReg4.6@175.865,87.55 IReg4.7@177.135,87.55 IReg4.8@178.405,87.55
RTD_BTN_Interm: D12.2 R23.2 R24.1 | length 5.6
  Top Layer w0.254: R24.1@211.25,89.95 211.25,89.9 210.574,89.224 210.563,89.224 210.16,88.821 D12.2@210.16,87.6 210.17,87.6 211.35,86.42 R23.2@211.35,85.3
"Sensor CAN Rx": R28.2 U1.91 | length 59
  Top Layer w0.254: R28.2@105.791,105.3 105.791,106.991 112.3,113.5 115.563,113.5 122.163,120.1 122.163,123.963 133.6,135.4 U1.91@149.025,135.4
"Sensor CAN Tx": R29.2 U1.92 | length 55.1
  Top Layer w0.254: R29.2@110.6,105.3 111.589,105.3 122.595,116.305 122.595,123.784 133.71,134.9 U1.92@149.025,134.9
Sensor_CAN_N: CN1.38 D21.2 R30.1 U3.6 | length 34.7
  Top Layer w0.381: U3.6@107.561,95.721 107.561,95.221 107.878,94.903 107.878,93.874 107.396,93.391 R30.1@107.396,93.341 107.396,93.291 107.9,92.787 107.9,92.242 107.655,91.997 107.455,91.997 107.246,91.787 107.246,91.687 107.455,91.478 107.826,91.478 115.749,83.555 115.749,78.489 123.056,71.183 123.777,71.183 124,70.959 CN1.38@124,69.5
Sensor_CAN_P: CN1.37 D21.1 R30.2 U3.7 | length 32.9
  Top Layer w0.381: U3.7@108.831,95.721 108.831,95.221 108.513,94.903 108.513,93.874 108.996,93.391 R30.2@108.996,93.341 108.996,93.291 108.513,92.809 108.513,92.22 108.736,91.997 108.936,91.997 109.146,91.787 D21.1@109.146,91.737 109.198,91.685 109.198,91.004 116.384,83.818 116.384,78.752 123.319,71.818 123.777,71.818 124,72.041 CN1.37@124,73.5
"Serial Rx": P2.2 U1.26 | length 6.4
  Top Layer w0.254: U1.26@164.075,130.9 165.6,130.9 166.5,130 166.5,127.94 P2.2@167.59,126.85
"Serial Tx": P2.1 U1.25 | length 4.5
  Top Layer w0.254: U1.25@162.55,129.375 162.55,127.85 163.6,126.8 165,126.8 P2.1@165.05,126.85
"Shutdown Tap Interm": D17.2 R40.1 R41.2 | length 6.8
  Top Layer w0.254: R41.2@127.8,105.812 126.71,104.722 D17.2@126.71,103.5 129.2,101.01 R40.1@129.2,100.463
Shutdown_Tap: CN1.31 R40.2 R42.2 | length 29.5
  Top Layer w0.254: R40.2@127.8,100.463 R42.2@127.8,98.963 127.8,79.7 CN1.31@134,73.5
SWDIO: D23.3 F3.1 U1.72 | length 113.2
  Top Layer w0.254: v2(99.6,106.3) 99.6,113.198 102.065,115.664 114.553,115.664 119,120.111 119,125.989 142.811,149.8 151.84,149.8 152.35,149.29 152.35,145.879 152.052,145.581 152.052,144.427 U1.72@152.05,144.425 ; F3.1@104.25,85.5 v2@104.25,91.75
  Top Layer w0.381: F3.1@104.2,85.45 F3.1@104.25,85.5 ; v2@104.25,91.75 v2(104.3,91.8)
  Bottom Layer w0.254: D23.3@97.439,91.761 v2@104.261,91.761 ; v2(99.6,106.3) 104.3,101.6 v2(104.3,91.8)
  Bottom Layer w0.381: D23.3@97.4,91.721 D23.3@97.439,91.761 ; v2@104.261,91.761 v2(104.3,91.8)
"SWDIO F": CN1.19 F3.2 | length 60.7
  Top Layer w0.381: F3.2@104.2,83.75 104.2,82.4 118.9,67.7 149.276,67.7 155,73.424 CN1.19@155,73.5
"TSA BTN": CN1.7 R25.1 R26.1 | length 51.9
  Top Layer w0.508: CN1.7@176,73.5 176,75.33 179.434,78.764 202.984,78.764 207.5,83.28 207.5,92.75 204.55,95.7 R25.1@204.55,95.75 R26.1@204.55,97.35
"TSA LED 1": R49.2 U1.4 | length 43.3
  Top Layer w0.254: U1.4@152.05,129.375 152.05,120 155.156,116.894 161.844,116.894 162.732,117.782 179.264,117.782 180.487,116.559 183.8,116.559 R49.2@183.8,116.509
"TSA LED 1 Output": CN1.13 IReg1.5 IReg1.6 IReg1.7 IReg1.8 | length 47.4
  Top Layer w0.508: CN1.13@166,73.5 168.782,76.282 168.782,81.282 173.368,85.868 179.868,85.868 182.25,88.25 182.25,98.669 184.595,101.014 IReg1.5@184.595,105.55 IReg1.6@185.865,105.55 IReg1.7@187.135,105.55 IReg1.8@188.405,105.55
"TSA LED 2": R55.2 U1.2 | length 34.4
  Top Layer w0.254: U1.2@151.05,129.375 151.05,119.779 154.798,116.03 162.202,116.03 163.09,116.918 173.39,116.918 R55.2@173.8,116.509
"TSA LED 2 Output": CN1.16 IReg3.5 IReg3.6 IReg3.7 IReg3.8 | length 41.5
  Top Layer w0.508: CN1.16@161,73.5 163.782,76.282 163.782,79.532 172.25,88 172.25,103.205 IReg3.5@174.595,105.55 IReg3.6@175.865,105.55 IReg3.7@177.135,105.55 IReg3.8@178.405,105.55
TSA_BTN_Interm: D14.2 R26.2 R27.1 | length 6.4
  Top Layer w0.254: D14.2@202.01,99.75 D14.2@202.02,99.75 ; R26.2@203.15,97.35 203.15,98.62 D14.2@202.02,99.75 ; R27.1@204.5,102.1 204.5,102.05 203.57,101.12 203.39,101.12 D14.2@202.02,99.75
"UC APPS 1": C21.2 D6.3 R17.2 R19.2 U1.15 | length 79.9
  Top Layer w0.254: U1.15@157.55,129.375 157.55,125.511 158.016,125.045 159.697,125.045 160.732,124.01 160.732,120.121 162.603,118.25 179.407,118.25 180.157,117.5 210.494,117.5 217.477,110.517 217.527,110.517 217.8,110.244 C21.2@217.8,110.194 R19.2@217.8,108.739 217.527,108.466 217.527,106.327 D6.3@217.5,106.3 217.773,106.027 217.773,103.323 R17.2@217.8,103.296
"UC APPS 2": C20.2 D5.3 R13.2 R15.2 U1.30 | length 65.2
  Top Layer w0.254: U1.30@164.075,132.9 192.1,132.9 201.05,123.95 213.05,123.95 214.033,122.967 217.577,122.967 217.85,122.694 C20.2@217.85,122.644 R15.2@217.85,121.189 217.577,120.916 217.577,118.777 D5.3@217.55,118.75 217.823,118.477 217.823,115.773 R13.2@217.85,115.746
"UC BPS": C26.2 D3.2 R60.2 U1.17 | length 65.2
  Top Layer w0.254: U1.17@158.55,129.375 158.55,128.2 157.982,127.632 157.982,125.69 158.195,125.477 159.876,125.477 161.163,124.189 161.163,120.3 162.782,118.682 179.585,118.682 180.335,117.932 195.482,117.932 v2(195.85,118.3) ; v2(195.9,116.65) C26.2@195.9,105.921 195.9,105.871 195.075,105.046 D3.2@195.075,104.167 195.373,103.869 195.969,103.869 197.55,102.287 R60.2@197.55,102.237
  Bottom Layer w0.254: v2(195.85,118.3) 195.875,118.275 195.875,116.675 v2(195.9,116.65)
"UC BT Rx": R32.2 U1.56 | length 56.4
  Top Layer w0.254: R32.2@112.7,142.5 133.068,142.5 142.163,151.595 156.837,151.595 160.05,148.382 U1.56@160.05,144.425
"UC BT Tx": R33.1 U1.55 | length 111.4
  Top Layer w0.254: R33.1@90.25,136.05 88.491,134.291 88.491,122.468 91.606,119.353 113.889,119.353 117.068,122.533 117.068,125.668 119.1,127.7 v2(119.1,127.8) ; v2(120.1,130) 120.5,130 130.2,139.7 v2(130.2,141.6) ; v2(130.2,143.2) 133.157,143.2 141.985,152.027 157.015,152.027 160.55,148.493 U1.55@160.55,144.425
  Bottom Layer w0.254: v2(119.1,127.8) 119.1,129 v2(120.1,130) ; v2(130.2,141.6) v2(130.2,143.2)
"UC Dash Toggle": C31.2 D15.2 R35.2 U1.37 | length 69
  Top Layer w0.254: U1.37@164.075,136.4 188.4,136.4 v2(191.1,133.7) ; v2(191.1,132.1) 191.125,132.1 204.525,118.7 v2(204.55,118.7) ; v2(204.55,116.5) 204.55,112.15 C31.2@211.05,105.65 211.05,105.6 210.125,104.675 D15.2@210.125,103.8 211.1,102.825 R35.2@211.1,101.95
  Bottom Layer w0.254: v2(191.1,132.1) v2(191.1,133.7) ; v2(204.55,116.5) v2(204.55,118.7)
"UC Regen Btn": C38.2 D20.2 R38.2 U1.34 | length 75.2
  Top Layer w0.254: U1.34@164.075,134.9 185.8,134.9 v2(187,133.7) ; v2(187,132.2) 187,132.175 200.45,118.725 v2(200.45,118.7) ; v2(200.45,116.6) 200.45,95.2 202.4,93.25 C38.2@203.15,93.25 203.15,92.279 D20.2@202.325,91.454 202.677,91.102 202.677,89.973 R38.2@202.95,89.7
  Bottom Layer w0.254: v2(187,132.2) v2(187,133.7) ; v2(200.45,116.6) v2(200.45,118.7)
"UC Regen Ctrl": R39.2 R59.2 U1.84 | length 85.7
  Top Layer w0.254: R39.2@93.05,91.934 R59.2@94.854,91.934 94.854,95.342 101.068,101.556 101.068,111.868 103.564,114.364 115.153,114.364 121.299,120.51 121.299,124.321 135.878,138.9 U1.84@149.025,138.9
"UC RTD BTN": C27.2 D8.2 R24.2 U1.36 | length 81.9
  Top Layer w0.254: U1.36@164.075,135.9 187.5,135.9 v2(189.7,133.7) ; v2(189.7,132.1) 189.725,132.1 203.125,118.7 v2(203.15,118.7) ; v2(203.15,116.5) 203.15,112.85 208.1,107.9 208.1,95 209.6,93.5 C27.2@211.2,93.5 211.2,93.45 210.275,92.525 D8.2@210.275,91.704 210.573,91.406 211.244,91.406 212.65,90 R24.2@212.65,89.95
  Bottom Layer w0.254: v2(189.7,132.1) v2(189.7,133.7) ; v2(203.15,116.5) v2(203.15,118.7)
"UC Shutdown Tap": C32.2 D16.2 R41.1 U1.87 | length 54.9
  Top Layer w0.254: R41.1@129.2,105.812 127.446,107.567 D16.2@126.825,107.567 126.825,108.346 C32.2@127.8,109.321 127.8,110.45 123.9,114.35 123.9,123.258 132.779,132.136 136.814,132.136 v2(137.15,131.8) ; v2(137.2,136.6) 138,137.4 U1.87@149.025,137.4
  Bottom Layer w0.254: v2(137.15,131.8) 137.175,131.825 137.175,136.575 v2(137.2,136.6)
"UC SWCLK": D11.3 F7.1 U1.76 | length 97
  Top Layer w0.254: v2(102.25,114.25) 102.839,114.25 103.389,114.8 114.979,114.8 120.867,120.689 120.867,124.5 135.699,139.332 140.032,139.332 143.6,142.9 U1.76@149.025,142.9 ; F7.1@102.9,85.543 102.9,92.7 v2(102.9,95.8) 102.9,112 v2(104.1,113.2)
  Top Layer w0.381: F7.1@102.807,85.45 F7.1@102.9,85.543
  Bottom Layer w0.254: D11.3@97.445,95.755 v2@102.855,95.755 ; v2@102.328,114.172 103.128,114.172 v2(104.1,113.2)
  Bottom Layer w0.381: D11.3@97.4,95.711 D11.3@97.445,95.755 ; v2(102.25,114.25) v2@102.328,114.172 ; v2@102.855,95.755 v2(102.9,95.8)
"UC SWCLK F": CN1.18 F7.2 | length 67.4
  Top Layer w0.381: F7.2@102.807,83.75 102.807,82.993 121.8,64 159.5,64 CN1.18@161,65.5
"UC SWO": D10.3 F6.1 U1.89 | length 90.5
  Top Layer w0.254: F6.1@101.6,85.55 v2(101.6,99.6) 101.6,111.789 103.742,113.932 115.332,113.932 121.731,120.331 121.731,124.142 133.421,135.832 142.332,135.832 142.9,136.4 U1.89@149.025,136.4
  Top Layer w0.381: F6.1@101.5,85.45 F6.1@101.6,85.55
  Bottom Layer w0.254: D10.3@97.4,99.7 v2@101.5,99.7
  Bottom Layer w0.381: v2@101.5,99.7 v2(101.6,99.6)
"UC SWO F": CN1.15 F6.2 | length 73.9
  Top Layer w0.381: F6.2@101.5,83.75 101.5,83.51 121.61,63.4 163.9,63.4 CN1.15@166,65.5
"UC TSA BTN": C30.2 D13.2 R27.2 U1.35 | length 63.4
  Top Layer w0.254: U1.35@164.075,135.4 186.6,135.4 v2(188.3,133.7) ; v2(188.3,132.1) 188.325,132.1 201.775,118.65 v2(201.8,118.65) ; v2(201.85,116.55) 201.85,106.85 C30.2@203,105.7 203,105.65 202.125,104.775 D13.2@202.125,103.854 202.827,103.152 202.827,102.373 R27.2@203.1,102.1
  Bottom Layer w0.254: v2(188.3,132.1) v2(188.3,133.7) ; v2(201.8,118.65) 201.825,118.625 201.825,116.575 v2(201.85,116.55)
"UC Vbatt": C33.2 D18.3 R44.2 R45.2 U1.32 | length 82.7
  Top Layer w0.254: R44.2@127.8,114.996 127.8,117.7 D18.3@127.5,118 127.5,120.241 R45.2@127.8,120.541 C33.2@127.8,121.996 128.804,123 145.997,123 154.297,114.7 160.8,114.7 161.299,114.201 162.952,114.201 v2(163.55,114.8) ; U1.32@164.075,133.9 v2(172.95,133.9) ; v2(164.45,119.95) 170.4,119.95 172.95,122.5 v2(172.95,132.2)
  Bottom Layer w0.254: v2(163.55,114.8) 164.45,115.7 v2(164.45,119.95) ; v2(172.95,132.2) v2(172.95,133.9) v2@172.975,133.925
Vbatt: C12.1 C13.2 C15.2 C16.1 C17.2 D2.K Q1.2 R22.2 R25.2 R31.2 R36.2 R43.1 R46.2 Ref1.4 REG1.1 REG2.1 | length 192.3
  Top Layer w0.254: R43.1@127.8,113.541 R46.2@127.8,112.087 133.25,106.637 147.387,106.637 C16.1@149.04,108.29
  Top Layer w0.381: v2(213.3,116.25) 213.275,116.275 213.275,117.721 C15.2@213.25,117.746 213.267,117.763 213.267,118.767 213.6,119.1 Ref1.4@213.9,119.1
  Top Layer w0.508: v3(139.25,91.25) D2.K@144.025,91.25 ; v2(201.6,83.15) 201.65,83.2 R36.2@203,83.2 ; v2(201.6,95.75) R25.2@203.15,95.75 ; v2(209.9,95.8) 209.925,95.775 211.125,95.775 R31.2@211.15,95.75 ; v2(210.05,83.75) 210.075,83.775 211.325,83.775 R22.2@211.35,83.8
  Top Layer w1.016: Q1.2@143.8,87.85 143.8,91.025 D2.K@144.025,91.25 144.025,95.755 REG2.1@149.04,100.77 ; C16.1@149.04,108.29 REG2.1@149.04,100.77 ; REG1.1@165.24,98.25 165.24,92.46 C12.1@165.95,91.75 163.42,91.75 161.484,93.686 156.124,93.686 REG2.1@149.04,100.77
  Bottom Layer w0.381: v2(209.9,95.8) 209.9,112.85 v2(213.3,116.25)
  Bottom Layer w0.508: REG1.1@165.24,98.25 199.1,98.25 v2(201.6,95.75) ; v2(209.9,95.8) 209.875,95.775 201.625,95.775 v2(201.6,95.75) ; v2(210.05,83.75) 209.974,83.75 209.374,83.15 v2(201.6,83.15) v2(201.6,95.75)
  Bottom Layer w0.762: C17.2@148.05,109 148.05,101.76 REG2.1@149.04,100.77
  Bottom Layer w1.016: C13.2@164.25,93.25 165.24,94.24 REG1.1@165.24,98.25
Vcap1: C22.2 U1.48 | length 3.5
  Top Layer w0.254: U1.48@164.075,141.9 165.5,141.9 166.95,140.45 C22.2@166.95,140.4
Vcap2: C2.2 U1.73 | length 4.6
  Top Layer w0.254: C2.2@151.5,148.759 151.805,148.454 151.805,145.978 151.55,145.723 U1.73@151.55,144.425
"VCU Power": F8.2 Q1.3 | length 13.1
  Top Layer w1.016: v3(135.9,81.1) 140.2,81.1 144.558,85.458 144.742,85.458 144.75,85.466 Q1.3@144.75,85.65
  Bottom Layer w1.016: v3(135.9,81.1) 135.9,83.185 F8.2@136,83.285
"WB Power 1": CN1.25 F9.2 | length 17.9
  Bottom Layer w1.016: F9.2@131.8,83.285 131.8,81.4 133.9,79.3 139.2,79.3 144,74.5 CN1.25@144,73.5
"WB Power 2": CN1.26 F10.2 | length 24.5
  Bottom Layer w1.016: F10.2@127.6,83.285 127.6,82.45 129.556,80.494 130.689,80.494 133.083,78.1 138.712,78.1 142.214,74.598 142.214,71.425 144,69.639 CN1.26@144,69.5
pads on no net: BT1.3 BT1.4 BT1.7 BT1.8 BT1.9 BT1.11 BT1.12 BT1.13 BT1.18 BT1.19 BT1.20 BT1.21 BT1.22 BT1.23 BT1.24 BT1.25 BT1.27 BT1.30 CN1.20 CN1.28 CN1.29 CN1.30 CN1.33 IReg1.2 IReg2.2 IReg3.2 IReg4.2 P1.1 Ref1.3 Ref1.5 U1.5 U1.7 U1.8 U1.9 U1.16 U1.18 U1.23 U1.24 U1.29 U1.31 U1.33 U1.38 U1.42 U1.43 U1.44 U1.45 U1.46 U1.47 U1.51 U1.52 U1.53 U1.54 U1.60 U1.61 U1.62 U1.63 U1.64 U1.65 U1.66 U1.67 U1.68 U1.69 U1.70 U1.71 U1.77 U1.78 U1.79 U1.80 U1.81 U1.82 U1.83 U1.85 U1.86 U1.88 U1.90 U1.93 U1.97 U1.98 U2.5 U2.8 U3.5 U3.8

## Polygon pours and split planes (outlines as drawn)
GND on Top Layer "Top Layer-GND" (solid, pour order 8): 84,142 96,154 174,154 202,126 220,126 226,120 226,84 218,76 208,76 208,66 204,62 106,62 102,66 102,76 92,76 84,84
GND on Bottom Layer "Bottom Layer-GND" (solid, pour order 10): 84,142 96,154 174,154 202,126 220,126 226,120 226,84 218,76 208,76 208,66 204,62 106,62 102,66 102,76 92,76 84,84

## Other copper
Top Layer:
  pour cut-out: 168,124
  pour cut-out: 144,148 144,130 152,122 164,122 168.725,126.725 168.725,148
Multi-Layer:
  pour cut-out: 108.5,124.5 92.5,124.5 92.5,145.5 82,135 82,156 98.5,156 98.5,145.5 95.5,145.5 95.5,143.5 105.5,143.5 105.5,146.5 108.5,146.5

## Silkscreen, mask and mechanical layers (free items; w line width, h text height)
Top Overlay:
  drawing of 6 lines, arcs and shapes, not listed
  text "ePBR20_VCB_rev1" at 131.7,153.1 h1.52
  text "37" at 124,76 h0.79
  text "4" at 180.1,75.4 h0.79
  text "1" at 185.4,75.3 h0.79
  text "5v" at 202.746,71.546 h1.52
  text "3v3" at 204.8,68.1 h1.52
Bottom Overlay:
  drawing of 13 lines, arcs and shapes, not listed
Board Outline:
  lines w0.254: 82,82 82,144 94,156 176,156 204,128 222,128 228,122 228,82 219,73 210,73 210,64 206,60 104,60 100,64 100,73 91,73 82,82